# Altium PCB Smart-Button-PCB-v2.2.PcbDoc
Units mm, origin at the board's own origin, x right, y up, seen from the top; angles counter-clockwise.
Board outline 90 x 83 mm, 2 copper layers (Top Layer, Bottom Layer), stack 1.17 mm thick; 43 components, 20 nets, 161 pads, 0 vias.
Unrouted connection lines stored in the file: 71.
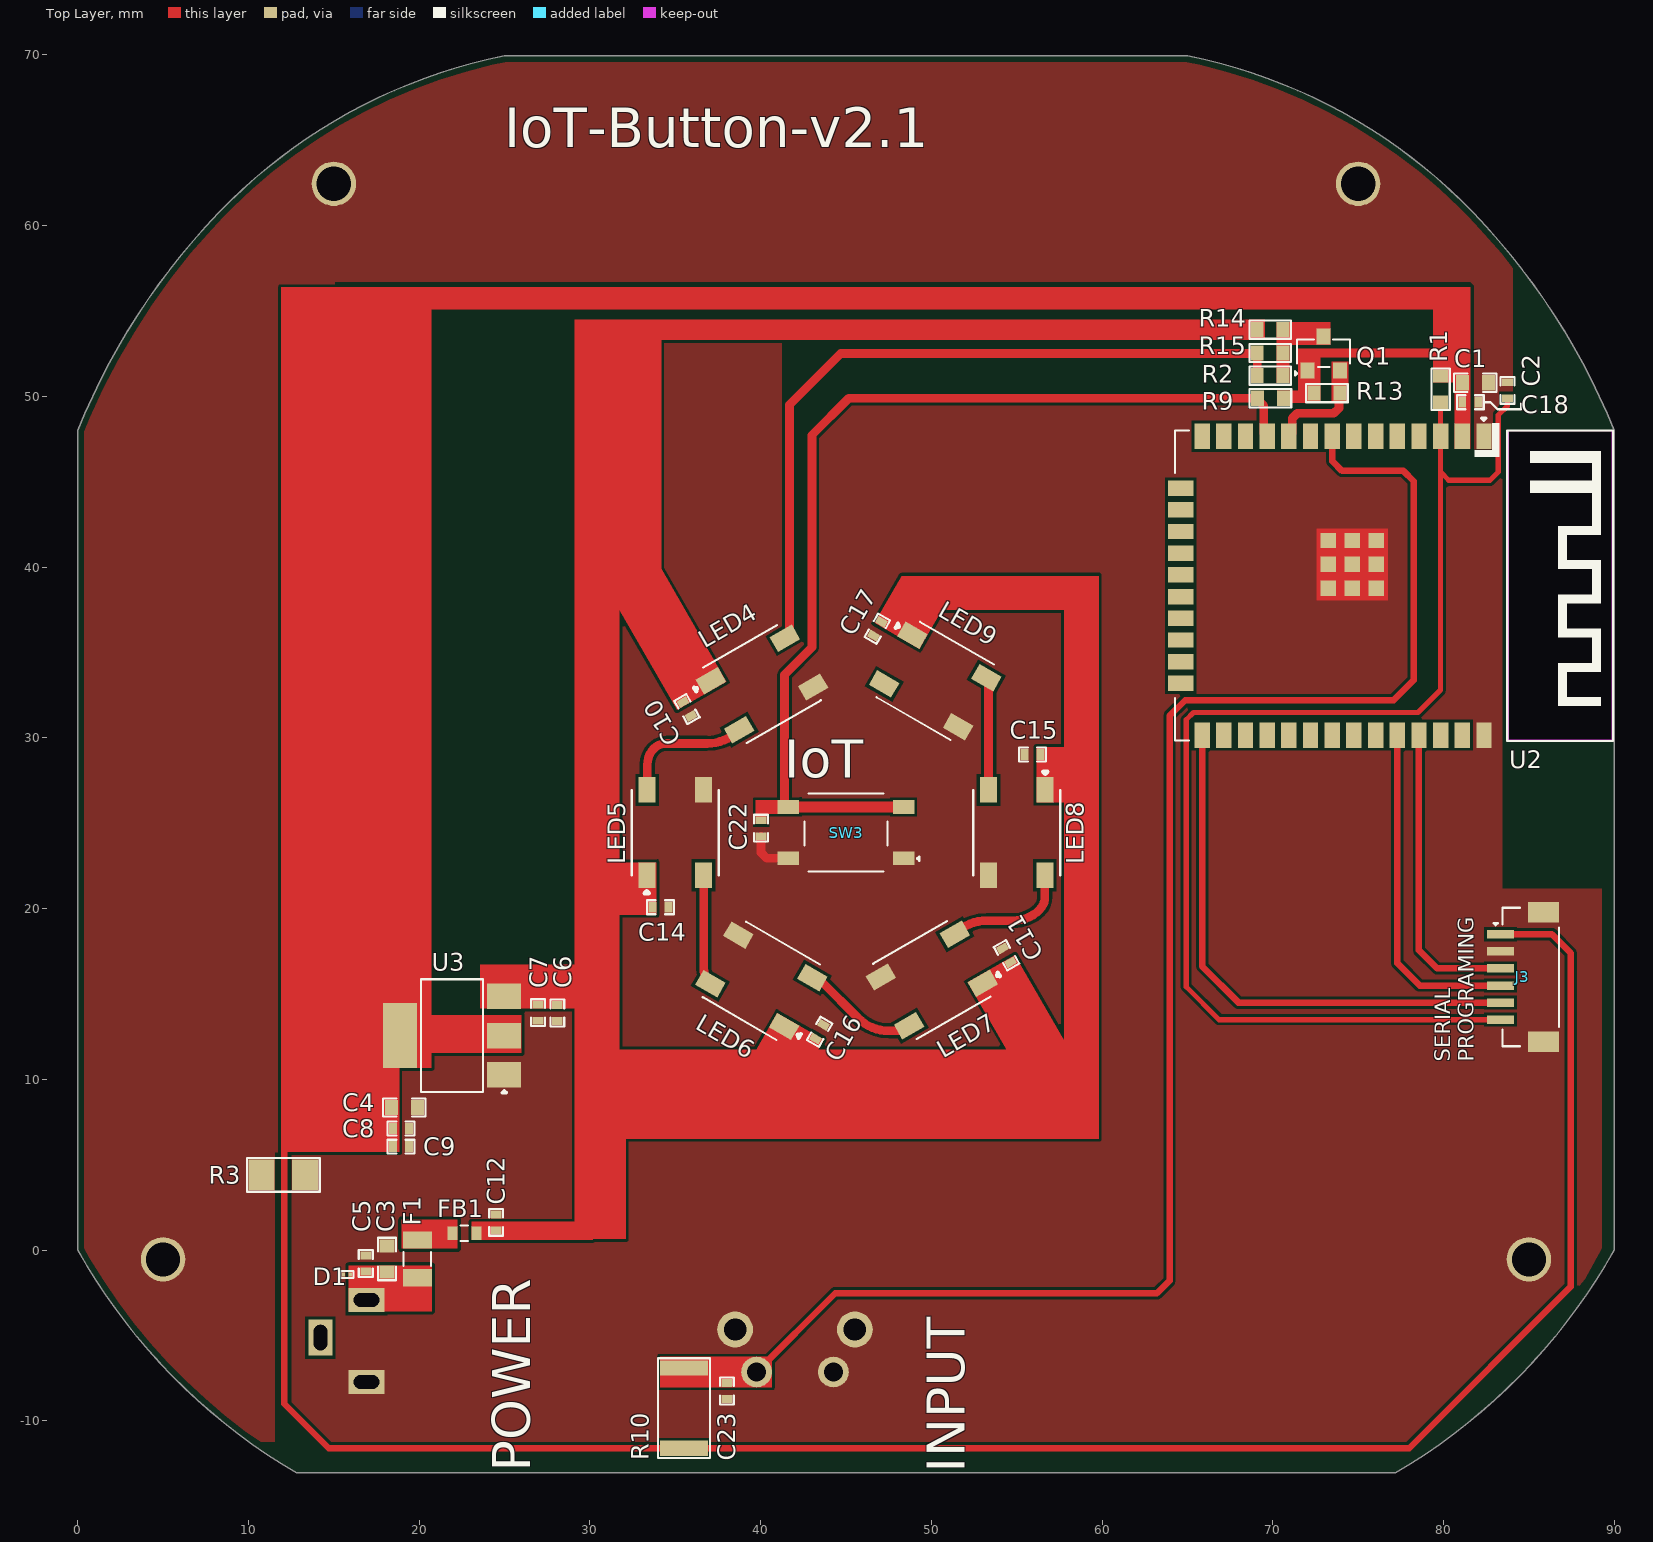
[diagram p0: Top Layer view]
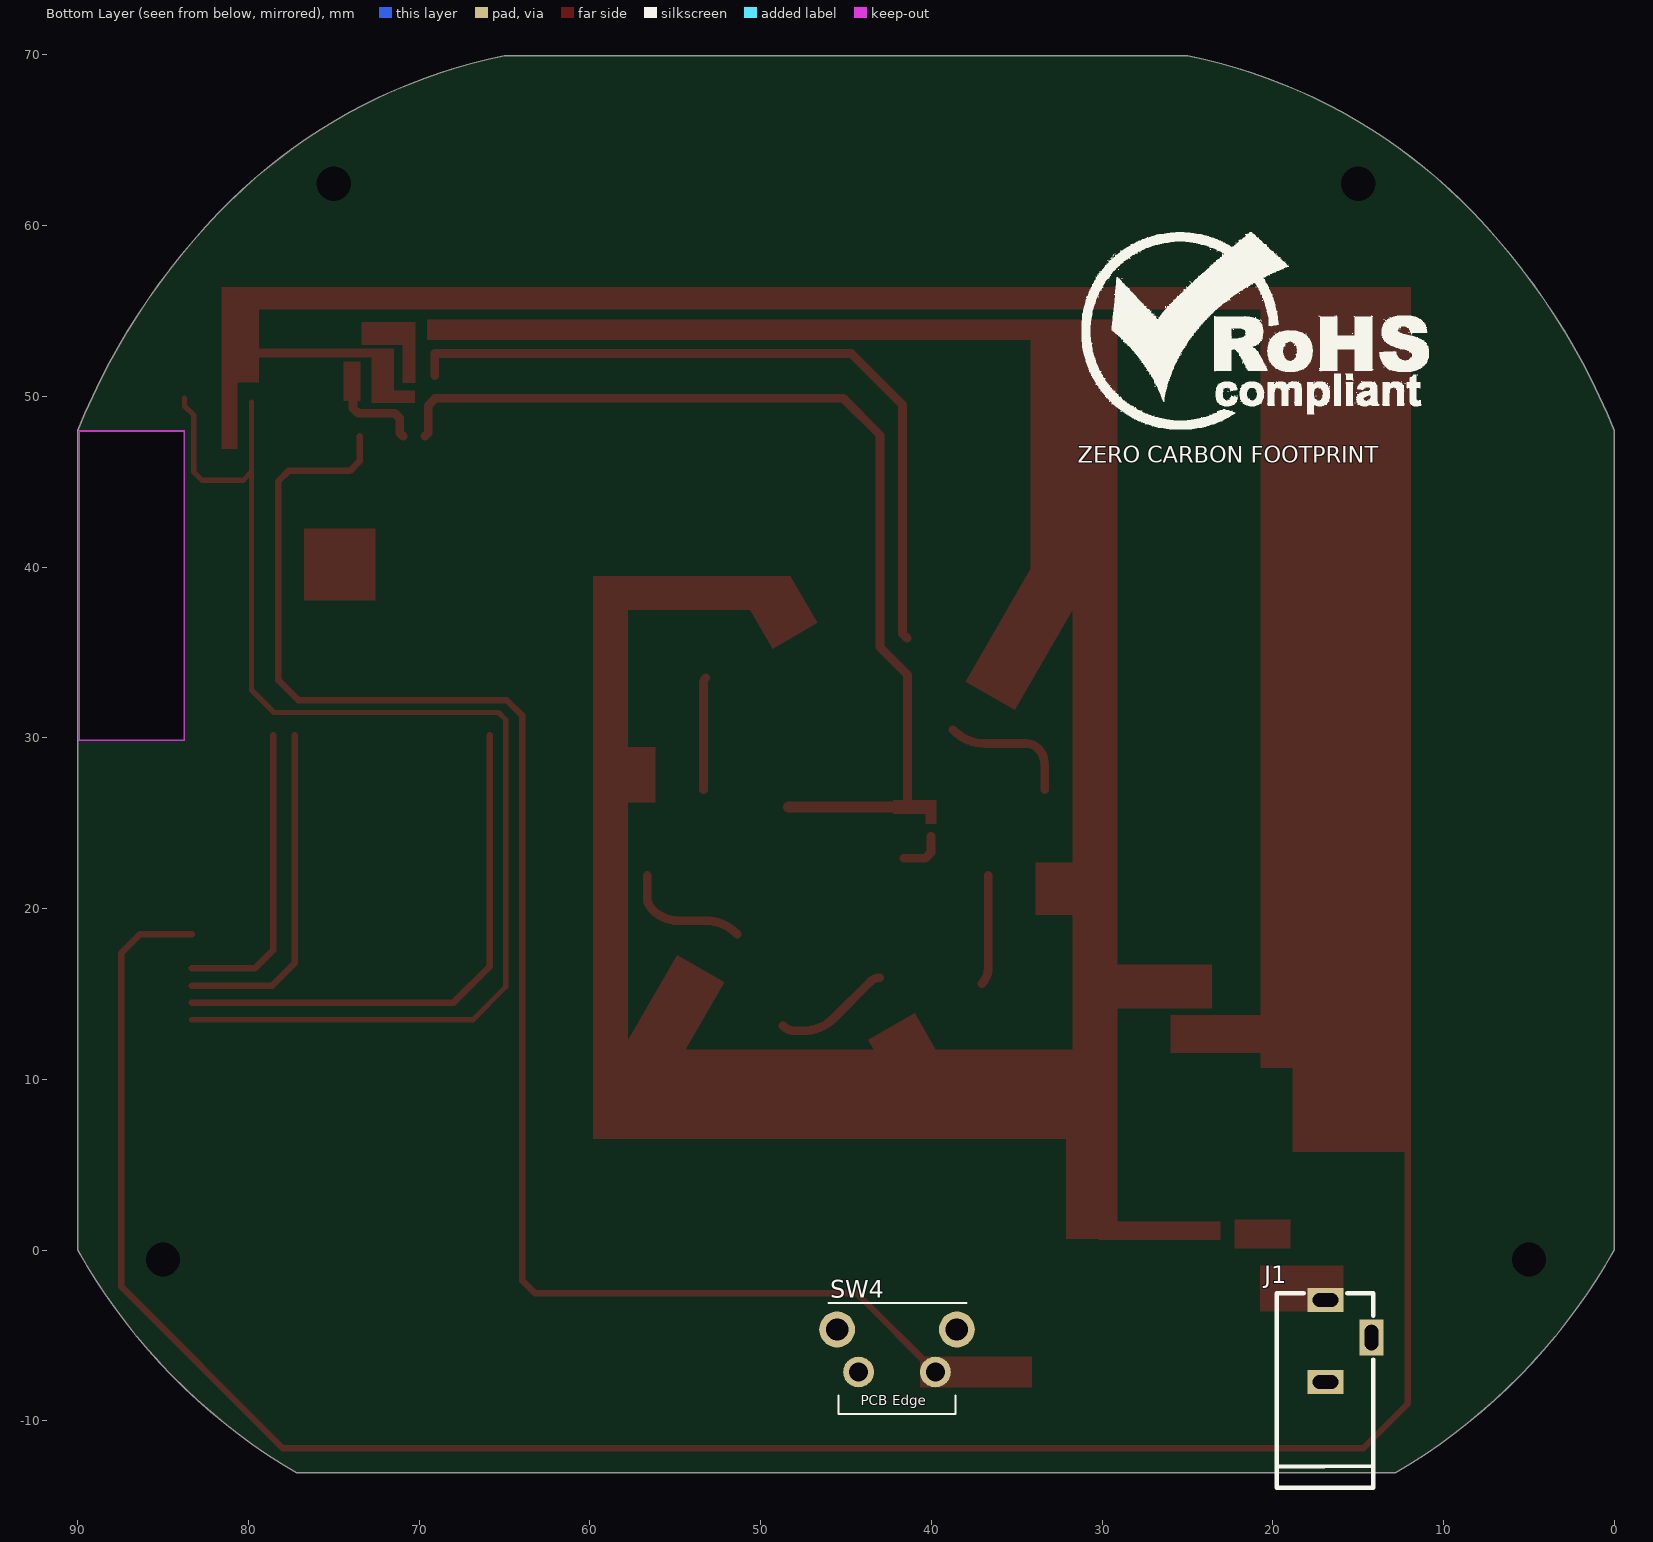
[diagram p1: Bottom Layer view, seen from below]
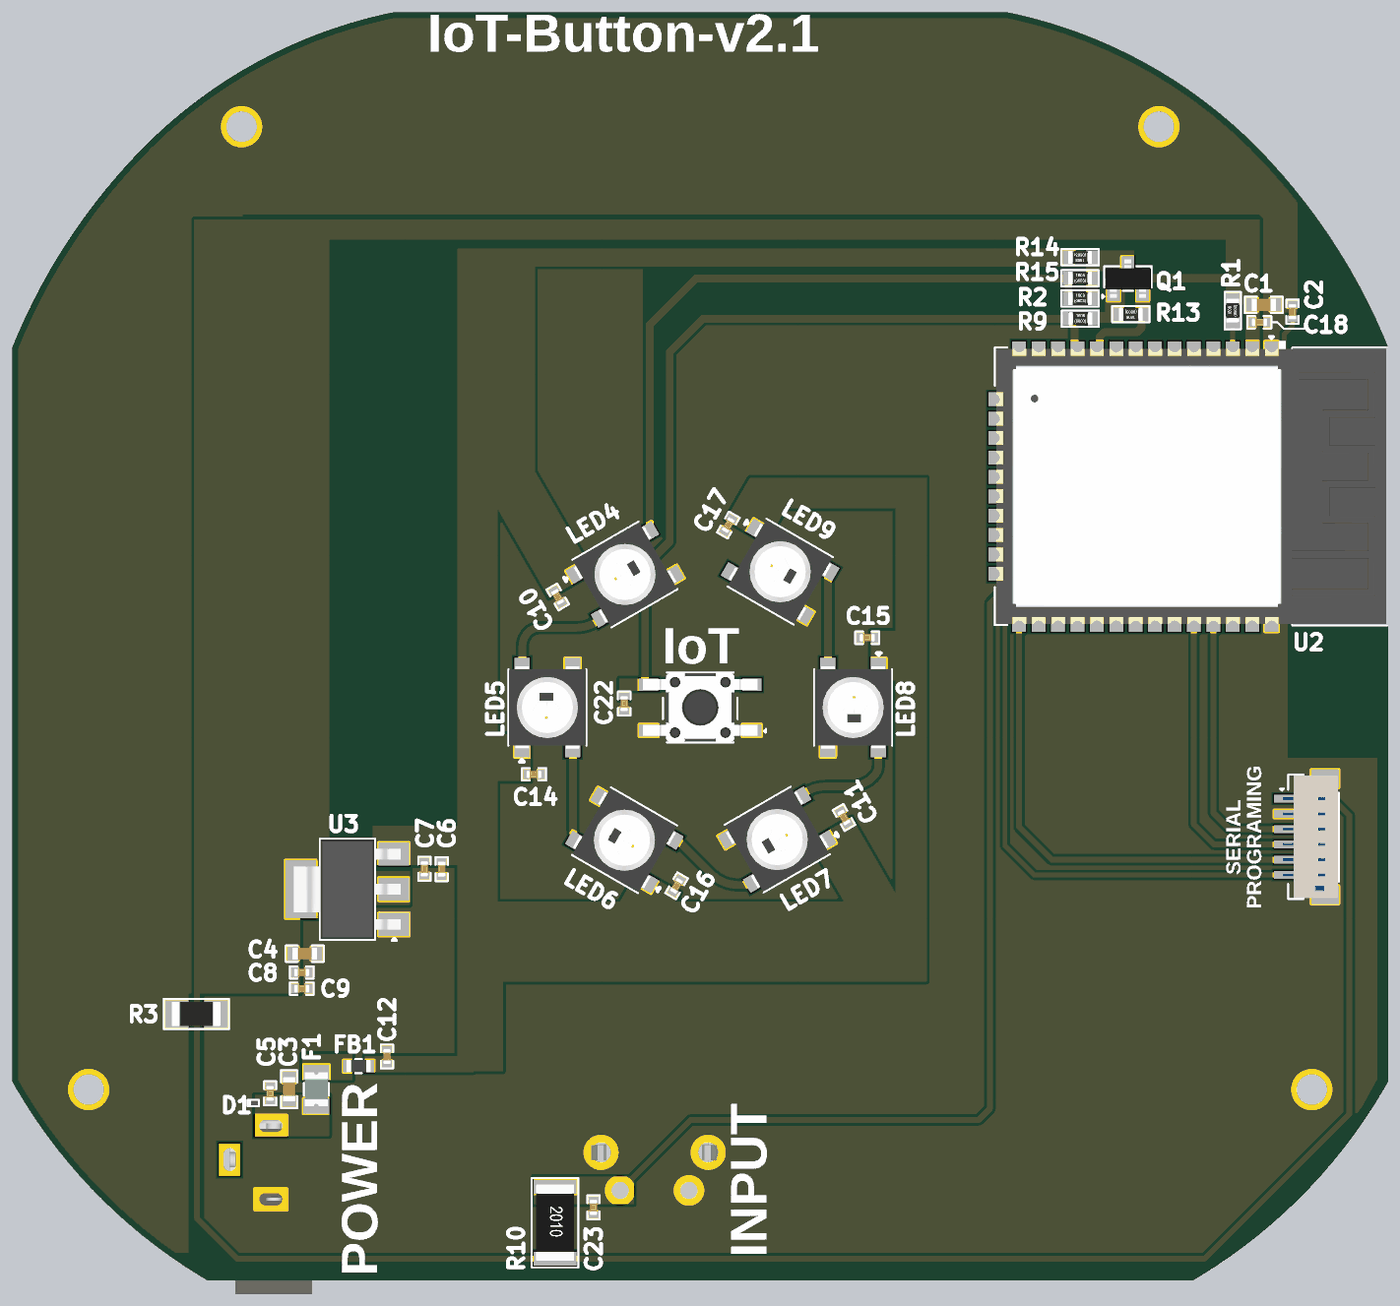
[diagram p2: 3D render of the assembled board from above, using the file's embedded part models]

## Layer stack, top to bottom
Top Solder: solder mask 0.01, Solder Resist, Dk 3.5
Top Layer: signal copper 0.035
Dielectric 1: dielectric 1.1, FR-4, Dk 4.8
Bottom Layer: signal copper 0.035
Bottom Solder: solder mask 0.01, Solder Resist, Dk 3.5

## Board outline
12.805,-13.044 cw(c30.512,17.147) 0,0 0,48 cw(c37.1,33.047) 8.25,60.754 cw(c31.33,38.589) 25,69.956 65,69.956 cw(c58.67,38.589) 81.75,60.754 cw(c52.9,33.047) 90,48 90,0 cw(c59.488,17.147) 77.195,-13.044
cut-out: 83.74,29.853 83.74,47.989 90,48 90,29.867

## Design rules (kind name [scope] priority, off if disabled: settings)
BoardOutlineClearance [All] p1: gap=0 ignorepadtopadclearanceinfootprint=FALSE except(0.381: Poly-OutlineEdge)
Clearance [All] p1: gap=0.178 ignorepadtopadclearanceinfootprint=TRUE
HoleToHoleClearance [All] p1: gap=0.127 allowstackedmicrovias=TRUE
MinimumSolderMaskSliver [All] p1: minsoldermaskwidth=0
PolygonConnect [All] p1: connectstyle=Direct reliefconductorwidth=0.432 reliefentries=4 polygonreliefangle="90 Angle" airgapwidth=0.254
RoutingLayers [All] p1: top layer_v5=TRUE bottom layer_v5=FALSE
RoutingVias [All] p1: holewidth=0.3 width=0.6 viastyle="Through Hole" minholewidth=0.3 minwidth=0.6 maxholewidth=0.3 maxwidth=0.6
SilkToSilkClearance [All] p1: silktosilkclearance=0
SilkToSolderMaskClearance [IsPad] p1: minsilkscreentomaskgap=0 clearancetoexposedcopper=TRUE
SolderMaskExpansion [All] p1: expansion=0.102 istentingtop=FALSE
UnRoutedNet [All] p1: checkbadconnections=TRUE
Width [All] p1: maxlimit=1.2 minlimit=0.254 preferedwidth=0.508 minimp=50.000000 maximp=50.000000 favimp=50.000000
24 further rules are at their usual default settings.

## Classes and differential pairs
component class U_Power-Section: C3 C4 C5 C6 C7 C8 C9 C12 D1 F1 FB1 J1 U3
component class U_LEDS: C10 C11 C14 C15 C16 C17 LED4 LED5 LED6 LED7 LED8 LED9 Q1 R2 R13 R14 R15
component class U_Controller-Section: C1 C2 C18 C22 C23 J3 R1 R3 R9 R10 SW3 SW4 U2

## Components (designator, comment, footprint, x,y, rotation, side; value= is the part's Value field where it differs from the comment)
C1 "22uF" Cap-0603 81.86,50.802 r180 top
C2 "100nF" Cap-0402 83.74,50.358 r270 top
C3 "1uF" Cap-0603 18.114,-0.522 r270 top
C4 "22uF" Cap-0603 19.133,8.349 r180 top
C5 "100nF" Cap-0402 16.87,-0.791 r270 top
C6 "4.7uF" Cap-0402 28.089,13.883 r90 top
C7 "1uF" Cap-0402 26.958,13.905 r90 top
C8 "1uF" Cap-0402 18.937,7.121 r180 top
C9 "0.1uF" Cap-0402 18.937,6.06 r180 top
C10 "100nF" Cap-0402 35.683,31.689 r120 top
C11 "100nF" Cap-0402 54.403,17.262 r300 top
C12 "0.1uF" Cap-0402 24.511,1.622 r270 top
C14 "100nF" Cap-0402 34.129,20.081 r180 top locked
C15 "100nF" Cap-0402 55.926,29.022 r0 top
C16 "100nF" Cap-0402 43.456,12.791 r240 top
C17 "100nF" Cap-0402 46.837,36.393 r60 top
C18 "100nF" Cap-0402 81.568,49.659 r180 top
C22 "100nF" Cap-0402 40.025,24.71 r90 top
C23 "100nF" Cap-0402 38.019,-8.248 r90 top
D1 "PESD5V0H1BSFYL" DSN0603-2 15.765,-1.425 r0 top
F1 "BSMD0805L-200" Fuse-0805 19.888,-0.522 r90 top
FB1 "BLM18SG121TN1D" "IND-0603 (1608 Metric)" 22.657,0.987 r180 top
J1 "HX DC002-1.3" "HX DC002-1.3" 16.916,-2.925 r90 bottom
J3 "Voltlink Target" "Voltlink Target" 84.598,15.996 r270 top
LED4 "WS2812B-XF02/W" WS2812B-XF02/W 40.078,33.161 r30 top
LED5 "WS2812B-XF02/W" WS2812B-XF02/W 35,24.456 r90 top locked
LED6 "WS2812B-XF02/W" WS2812B-XF02/W 40.041,15.773 r150 top
LED7 "WS2812B-XF02/W" WS2812B-XF02/W 50.033,15.815 r210 top
LED8 "WS2812B-XF02/W" WS2812B-XF02/W 55,24.456 r270 top locked
LED9 "WS2812B-XF02/W" WS2812B-XF02/W 50.227,33.339 r330 top
Q1 "Si2302CDS" Sot-23 72.974,52.514 r0 top
R1 "10K" Res-0603 79.828,50.421 r270 top
R2 "DNP" Res-0603 69.846,51.221 r180 top
R3 "0R" Res-1206 12.04,4.406 r0 top value=0mR
R9 "10K" Res-0603 69.858,49.894 r180 top
R10 "10K" RES-2010 35.505,-9.256 r270 top
R13 "10K" Res-0603 73.167,50.193 r0 top
R14 "10K" Res-0603 69.846,53.914 r0 top
R15 "1K" Res-0603 69.846,52.542 r180 top
SW3 "GT-TC074E-H080-L1" GT-TC074E-H080-L1 45,24.456 r180 top locked
SW4 "1825027-8" 1825027-8 42.013,-5.897 r180 bottom
U2 "ESP32-WROOM-32E-N8R2" "38-SMD Module" 73.488,38.915 r270 top
U3 "AMS1117-3.3" "SOT- 223" 21.916,12.563 r90 top

## Footprints (in the part's own frame and the unit in brackets; to place one, negate y for a bottom-side part, rotate by r counter-clockwise, add the part's x,y. Pads: shape width x height; smd on the part's side, far side on the other; paste and mask are expansions set on the pad)
"38-SMD Module" [mm]
  rect 1.5x0.9 smd: 1(-8.75,8.88) 2(-8.75,7.61) 3(-8.75,6.34) 4(-8.75,5.07) 5(-8.75,3.8) 6(-8.75,2.53) 7(-8.75,1.26) 8(-8.75,-0.01) 9(-8.75,-1.28) 10(-8.75,-2.55) 11(-8.75,-3.82) 12(-8.75,-5.09) 13(-8.75,-6.36) 14(-8.75,-7.63) 25(8.75,-7.63) 26(8.75,-6.36) 27(8.75,-5.09) 28(8.75,-3.82) 29(8.75,-2.55) 30(8.75,-1.28) 31(8.75,-0.01) 32(8.75,1.26) 33(8.75,2.53) 34(8.75,3.8) 35(8.75,5.07) 36(8.75,6.34) 37(8.75,7.61) 38(8.75,8.88)
  rect 0.9x1.5 smd: 15(-5.71,-8.88) 16(-4.44,-8.88) 17(-3.17,-8.88) 18(-1.9,-8.88) 19(-0.63,-8.88) 20(0.64,-8.88) 21(1.91,-8.88) 22(3.18,-8.88) 23(4.45,-8.88) 24(5.72,-8.88)
  rect 0.9x0.9 smd: 39(-2.65,2.56) 40(-1.25,2.56) 41(0.15,2.56) 42(-2.65,1.16) 43(-1.25,1.16) 44(0.15,1.16) 45(-2.65,-0.24) 46(-1.25,-0.24) 47(0.15,-0.24)
  Keep-Out Layer region: -9.043,10.287 9.042,10.287 9.042,16.383 -9.043,16.383
  silkscreen extent -9.8,-9.22 9.09,16.43, body extent -9,-9.12 9,16.38, height 3.25
1825027-8 [mm]
  round 1.8 hole 1.1: 1(-2.25,-1.245) 2(2.25,-1.245)
  round 2.1 hole 1.3: 3(3.505,1.245) 4(-3.505,1.245)
  silkscreen extent -4.01,-3.71 4.06,2.79, body extent -4.18,-7.11 4.23,2.73, height 8
Cap-0402 [mil]
  rect 18x25 smd mask+2.36: 1(-18.5,0) 2(18.5,0)
  silkscreen extent -31,-16 31,16, body extent -20,-10 20,10, height 19
Cap-0603 [mil]
  rect 30x35 smd mask+2.36: 1(-30,0) 2(30,0)
  silkscreen extent -49,-21 49,21, body extent -32,-16 31,16, height 34
DSN0603-2 [mm]
  rect 0.2x0.24 smd mask+0.055: 1(-0.2,0) 2(0.2,0)
  silkscreen extent -0.38,-0.2 0.38,0.2, body extent -0.3,-0.15 0.3,0.15, height 0.32
Fuse-0805 [mm]
  rect 1x1.7 smd: 1(-1.1,0) 2(1.1,0)
  silkscreen extent -0.41,-0.81 0.41,0.81, body extent -1.1,-0.75 1.1,0.75, height 1.24
GT-TC074E-H080-L1 [mm]
  rect 1.25x0.8 smd: 1(-3.375,1.5) 2(3.375,1.5) 3(-3.375,-1.5) 4(3.375,-1.5)
  silkscreen extent -4.29,-2.29 2.44,2.29, body extent -3.75,-2.25 3.75,2.25, height 8
"HX DC002-1.3" [mm]
  rect 1.4x2.1 hole 0.8 slot 1.5 at 90 deg: 1(0,0) 2(-4.8,0)
  rect 2.1x1.4 hole 0.8 slot 1.5 at 0 deg: 3(-2.2,-2.7)
  silkscreen extent -11,-2.79 0.4,2.84, body extent -11,-2.69 0.4,2.69, height 7.5
"IND-0603 (1608 Metric)" [mm] "0.063\" L x 0.032\" W (1.60mm x 0.80mm)"
  rect 0.6x0.8 smd: 1(-0.7,0) 2(0.7,0)
  silkscreen extent -0.2,-0.46 0.23,0.46, body extent -0.8,-0.4 0.8,0.4, height 0.78
Res-0603 [mil]
  rect 30x35 smd: 1(-30,0) 2(30,0)
  silkscreen extent -48,-21 48,21, body extent -31,-17 31,17, height 18
Res-1206 [mil]
  rect 60x70 smd: 1(-50,0) 2(50,0)
  silkscreen extent -84,-39 84,39, body extent -63,-31 63,31, height 24
RES-2010 [mm]
  rect 0.9x2.8 smd: 1(-2.35,0) 2(2.35,0)
  silkscreen extent -2.92,-1.52 2.92,1.52, body extent -2.5,-1.25 2.5,1.25, height 0.6
Sot-23 [mm] "TRANS NPN 40V 0.6A SOT23"
  rect 0.82x0.92 smd: 1(-0.95,-1) 2(0.95,-1) 3(0,1)
  silkscreen extent -1.68,-1.3 1.55,0.81, body extent -1.5,-1.25 1.5,1.25, height 1.05
"SOT- 223" [mm]
  rect 1.5x2 smd: 1(-2.3,-3.05) 2(0,-3.05) 3(2.3,-3.05)
  rect 3.8x2 smd: 4(0,3.05)
  silkscreen extent -3.35,-3.2 3.3,1.8, body extent -3.25,-3.5 3.25,3.5, height 1.61
"Voltlink Target" [mm]
  rect 0.5x1.6 smd: 1(-2.5,-1.262) 2(-1.5,-1.262) 3(-0.5,-1.262) 4(0.5,-1.262) 5(1.5,-1.262) 6(2.5,-1.262)
  rect 1.2x1.8 smd: MP1(-3.8,1.262) MP2(3.8,1.262)
  silkscreen extent -4.06,-1.68 4.06,2.17, body extent -4,-1.49 4,2.11, height 4.25
WS2812B-XF02/W [mm]
  rect 1.5x1 smd: 1(-2.5,1.65) 2(-2.5,-1.65) 3(2.5,-1.65) 4(2.5,1.65)
  silkscreen extent -3.56,-2.55 2.5,2.55, body extent -2.7,-2.5 2.7,2.5, height 1.55

## Part data
C1 C4: library part CL10A226MO7JZNC, "CAP CER 22UF 16V X5R 0603", Case Code (Imperial)=0603, Case Code (Metric)=1608, LCSC Part Number=C2762594, Manufacturer=Samsung, Max Operating Temperature=85°C, Min Operating Temperature=-55°C, Tolerance=20%, Voltage Rating=16V, Case/Package=0603, ComponentLink1Description=http://www.samsungsem.com/kr/support/product-search/mlcc/CL10A226MO7JZNC.jsp?src-supplier=Digikey, ComponentLink1URL=http://www.samsungsem.com/kr/support/product-search/mlcc/CL10A226MO7JZNC.jsp?src-supplier=Digikey, ComponentLink2Description=https://datasheet.octopart.com/CL10A226MO7JZNC-Samsung-Electro-Mechanics-datasheet-149156497.pdf?src-supplier=Future+Electronics, ComponentLink2URL=https://datasheet.octopart.com/CL10A226MO7JZNC-Samsung-Electro-Mechanics-datasheet-149156497.pdf?src-supplier=Future+Electronics, Height=900um, Item Type=Capacitors, Manufacturer Part Number=CL10A226MO7JZNC, Material=4241ConductorMaterial, Mounting Technology="Surface Mount", Packaging="Cut Tape", Pricing="1=0.65, 10=0.391, 50=0.2884, 100=0.2564, 500=0.20198, 1000=0.18499 (USD)", RoHS=Yes, RoHS Compliant=Yes, Series=CL, Stock=944984, Supplier=Digikey
C2 C5 C10 C11 C14 C15 C16 C17 C18 C22 C23: library part CC0402KRX5R8BB104, "CAP CER 0.1UF 25V X5R 0402", Case Code (Imperial)=0402, Case Code (Metric)=1005, Dielectric=X5R, LCSC Part Number=C106256, Manufacturer=Yageo, Max Operating Temperature=85°C, Min Operating Temperature=-55°C, Resistor Type=Ceramic, Supplier Part Number 1=311-1697-1-ND, Tolerance=10%, Voltage Rating=25V, Capacitance=100nF, Case/Package=0402, Category="Ceramic Capacitors", ComponentLink1Description=http://www.mouser.com/ds/2/447/UPY-GPHC_X5R_4V-to-50V_25-1131599.pdf?src-supplier=Mouser, ComponentLink1URL=http://www.mouser.com/ds/2/447/UPY-GPHC_X5R_4V-to-50V_25-1131599.pdf?src-supplier=Mouser, ComponentLink2Description=http://www.yageo.com/documents/recent/UPY-GPHC_X5R_4V-to-50V-16.pdf?src-supplier=Future+Electronics, ComponentLink2URL=http://www.yageo.com/documents/recent/UPY-GPHC_X5R_4V-to-50V-16.pdf?src-supplier=Future+Electronics, ComponentLink3Description=http://www.yageo.com/documents/recent/UPY-GPHC_X5R_4V-to-50V_25.pdf?src-supplier=Digi-Key, ComponentLink3URL=http://www.yageo.com/documents/recent/UPY-GPHC_X5R_4V-to-50V_25.pdf?src-supplier=Digi-Key, Depth=0.5mm, Halogen Free="Halogen Free", Item Type=Capacitor, Lead Free="Lead Free", Length=0.039inch, Manufacturer Part Number=CC0402KRX5R8BB104, Mount="Surface Mount", Packaging="Tape and Reel", Pricing 1="1=0.10000, 10=0.03800, 50=0.02100, 100=0.01710, 500=0.01224, 1000=0.00961, 2500=0.00874, 5000=0.00804 (USD)", RoHS=Yes, RoHS Compliant=Yes, Series=CC, Stock 1=4598218, Supplier 1=Digi-Key, Thickness=0.022inch, Voltage Rating (DC)=25V, Width=0.02inch
C3: library part CC0603KRX5R8BB105, "CAP CER 1UF 25V X5R 0603", Case Code (Imperial)=0603, Case Code (Metric)=1608, Dielectric=X5R, LCSC Part Number=C14664, Manufacturer=Yageo, Max Operating Temperature=85°C, Min Operating Temperature=-55°C, Package Quantity=1, Supplier Part Number 1=311-1445-1-ND, Tolerance=10%, Voltage Rating=25V, Capacitance=1uF, Case/Package=0603, Category="Ceramic Capacitors", ComponentLink1Description=https://datasheet.ciiva.com/176/mlccorderingcode-176785.pdf?src-supplier=Digi-Key, ComponentLink1URL=https://datasheet.ciiva.com/176/mlccorderingcode-176785.pdf?src-supplier=Digi-Key, ComponentLink2Description=https://datasheet.ciiva.com/176/mlccorderingcode-176786.pdf?src-supplier=Digi-Key, ComponentLink2URL=https://datasheet.ciiva.com/176/mlccorderingcode-176786.pdf?src-supplier=Digi-Key, ComponentLink3Description=https://datasheet.ciiva.com/176/mlccorderingcode-176787.pdf?src-supplier=Digi-Key, ComponentLink3URL=https://datasheet.ciiva.com/176/mlccorderingcode-176787.pdf?src-supplier=Digi-Key, ComponentLink4Description=https://datasheet.ciiva.com/17436/upy-gphc-x5r-4v-to-50v-12-17436952.pdf?src-supplier=Avnet+Europe, ComponentLink4URL=https://datasheet.ciiva.com/17436/upy-gphc-x5r-4v-to-50v-12-17436952.pdf?src-supplier=Avnet+Europe, ComponentLink5Description=https://datasheet.ciiva.com/7978/1525783-7978171.pdf?src-supplier=Element14, ComponentLink5URL=https://datasheet.ciiva.com/7978/1525783-7978171.pdf?src-supplier=Element14, ComponentLink6Description=https://datasheet.ciiva.com/11586/upy-gphc-x5r-4v-to-50v-12-11586318.pdf?src-supplier=Avnet, ComponentLink6URL=https://datasheet.ciiva.com/11586/upy-gphc-x5r-4v-to-50v-12-11586318.pdf?src-supplier=Avnet, Construction=Flat, Depth=0.8mm, Halogen Free="Halogen Free", Height=0.8mm, Item Type=Capacitor, Lead Free="Lead Free", Length=1.6mm, Manufacturer Part Number=CC0603KRX5R8BB105, Mount="Surface Mount", Number of Pins=2, Packaging="Tape and Reel", Pricing 1="1=0.12000, 10=0.08400, 50=0.04760, 100=0.03940, 500=0.02764, 1000=0.02288 (USD)", Radiation Hardening=No, REACH SVHC="No SVHC", RoHS=Yes, RoHS Compliant=Yes, Series=CC, Stock 1=919939, Supplier 1=Digi-Key, Termination=SMD/SMT, Thickness=0.035inch, Voltage Rating (DC)=25V, Width=0.031inch
C6: library part CC0402KRX5R6BB475, "CAP CER 4.7UF 10V X5R 0402", Case Code (Imperial)=0402, Case Code (Metric)=1005, LCSC Part Number=C326586, Manufacturer=Yageo, Max Operating Temperature=85°C, Min Operating Temperature=-55°C, Supplier Part Number 1=3871698, Tolerance=10%, Voltage Rating=10V, Capacitance=4.7uF, Case/Package=0402, Category="Ceramic Capacitors", ComponentLink1Description=http://www.yageo.com/documents/recent/UPY-GPHC_X5R_4V-to-50V_25.pdf?src-supplier=Digi-Key, ComponentLink1URL=http://www.yageo.com/documents/recent/UPY-GPHC_X5R_4V-to-50V_25.pdf?src-supplier=Digi-Key, Manufacturer Part Number=CC0402KRX5R6BB475, Mount="Surface Mount", Packaging="Cut Tape", Pricing 1="10000=0.02310, 50000=0.02100 (GBP)", RoHS=Yes, RoHS Compliant=Yes, Stock 1=20000, Supplier 1=Farnell
C7 C8: library part CC0402KRX5R7BB105, "CAP CER 1UF 16V X5R 0402", Case Code (Imperial)=0402, Case Code (Metric)=1005, Dielectric=X5R, LCSC Part Number=C325464, Manufacturer=Yageo, Max Operating Temperature=85°C, Min Operating Temperature=-55°C, Supplier Part Number 1=311-1691-6-ND, Tolerance=10%, Voltage Rating=16V, Capacitance=1uF, Case/Package=0402, ComponentLink1Description=http://www.yageo.com/documents/recent/UPY-GPHC_X5R_4V-to-50V_12.pdf?src-supplier=Avnet+Europe, ComponentLink1URL=http://www.yageo.com/documents/recent/UPY-GPHC_X5R_4V-to-50V_12.pdf?src-supplier=Avnet+Europe, Composition=Ceramic, Depth=0.5mm, Halogen Free="Halogen Free", Height=0.5mm, Item Type=Capacitor, Lead Free="Lead Free", Length=1mm, Manufacturer Part Number=CC0402KRX5R7BB105, Mount="Surface Mount", Packaging="Tape and Reel", Pricing 1="1=0.36, 10=0.252, 100=0.1512, 500=0.1134, 1000=0.09576, 2500=0.09072, 5000=0.08568 (USD)", Radiation Hardening=No, Stock 1=1405667, Supplier 1=Digi-Key, Termination=SMD/SMT, Thickness=0.022inch, Voltage Rating (DC)=16V, Weight=2.3E-05oz, Width=0.02inch
C9 C12: library part CL05B104KB54PNC, "CAP CER 0.1UF 50V X7R 0402", LCSC Part Number=C307331, Manufacturer=Samsung, Supplier Part Number 1=1276-CL05B104KB54PNCDKR-ND, Manufacturer Part Number=CL05B104KB54PNC, Pricing 1="1=0.1, 10=0.067, 50=0.0366, 100=0.0299, 500=0.02138, 1000=0.01681, 2500=0.01528, 5000=0.01406 (USD)", Stock 1=8594, Supplier 1=Digi-Key
D1: "TVS DIODE 5VWM 6.3VC DSN0603-2", LCSC Part Number=C477989, Manufacturer=Nexperia, Category="ESD and Circuit Protection ICs", ComponentLink1Description=http://www.farnell.com/datasheets/1961312.pdf?src-supplier=Farnell, ComponentLink1URL=http://www.farnell.com/datasheets/1961312.pdf?src-supplier=Farnell, ComponentLink2Description=https://assets.nexperia.com/documents/data-sheet/PESD5V0H1BSF.pdf?src-supplier=Digi-Key, ComponentLink2URL=https://assets.nexperia.com/documents/data-sheet/PESD5V0H1BSF.pdf?src-supplier=Digi-Key, ComponentLink3Description=http://www.farnell.com/datasheets/1961312.pdf?src-supplier=Newark, ComponentLink3URL=http://www.farnell.com/datasheets/1961312.pdf?src-supplier=Newark, Item Type=Diode, Manufacturer Part Number=PESD5V0H1BSFYL, Pricing 1="18000=0.06453, 36000=0.06278, 54000=0.06104, 90000=0.05930, 180000=0.05755, 900000=0.05581, 1800000=0.05406 (USD)", RoHS=Yes, RoHS Compliant=Yes, Stock 1=9000, Supplier 1=Avnet, Supplier Part Number 1=PESD5V0H1BSFYL
F1: "6V 2A 50A 1W -40℃~+85℃ 4A 4mΩ 5s 45mΩ 0805 Resettable Fuses ROHS", LCSC Part Number=C2757931, Manufacturer=BHFUSE, Package=0805, ComponentLink1Description=LCSC, ComponentLink1URL=https://www.lcsc.com/product-detail/Resettable-Fuses_BHFUSE-BSMD0805L-200_C2757931.html, Item Type=Fuse, Manufacturer Part Number=BSMD0805L-200
FB1: "FERRITE BEAD 120 OHM 0603 1LN", Case Code (Imperial)=0603, Case Code (Metric)=1608, Current Rating=3A, DC Resistance (DCR)=25mR, Frequency=100MHz, LCSC Part Number=C113030, Manufacturer=Murata, Max Operating Temperature=125°C, Min Operating Temperature=-55°C, Package Quantity=1, Tolerance=25%, Case/Package=0603, Category="Ferrite Beads and Chips", ComponentLink1Description=https://datasheet.ciiva.com/1012/l0110s0100blm18s-1012624.pdf?src-supplier=Digi-Key, ComponentLink1URL=https://datasheet.ciiva.com/1012/l0110s0100blm18s-1012624.pdf?src-supplier=Digi-Key, ComponentLink2Description=https://datasheet.ciiva.com/11799/0900766b811b5866-11799181.pdf?src-supplier=RSComponents, ComponentLink2URL=https://datasheet.ciiva.com/11799/0900766b811b5866-11799181.pdf?src-supplier=RSComponents, ComponentLink3Description=https://datasheet.ciiva.com/18093/getdatasheetpartid-295885-18093249.pdf?src-supplier=Verical, ComponentLink3URL=https://datasheet.ciiva.com/18093/getdatasheetpartid-295885-18093249.pdf?src-supplier=Verical, ComponentLink4Description=https://datasheet.ciiva.com/41449/001171723-da-01-en-chip-drossel0603-120r-3000ma-1-6x0-8mm-41449353.pdf?src-supplier=Conrad, ComponentLink4URL=https://datasheet.ciiva.com/41449/001171723-da-01-en-chip-drossel0603-120r-3000ma-1-6x0-8mm-41449353.pdf?src-supplier=Conrad, ComponentLink5Description=https://datasheet.ciiva.com/41449/001172312-da-01-en-drossel-0603-120r-1-6x0-8mm-10000st-41449675.pdf?src-supplier=Conrad, ComponentLink5URL=https://datasheet.ciiva.com/41449/001172312-da-01-en-drossel-0603-120r-1-6x0-8mm-10000st-41449675.pdf?src-supplier=Conrad, ComponentLink6Description=https://datasheet.ciiva.com/8021/5151-8021511.pdf?src-supplier=Element14, ComponentLink6URL=https://datasheet.ciiva.com/8021/5151-8021511.pdf?src-supplier=Element14, ComponentLink7Description=https://datasheet.ciiva.com/8021/5151-8021512.pdf?src-supplier=Element14, ComponentLink7URL=https://datasheet.ciiva.com/8021/5151-8021512.pdf?src-supplier=Element14, ComponentLink8Description=https://datasheet.ciiva.com/14122/blm-series-eng-tds-14122906.pdf?src-supplier=Distrelec, ComponentLink8URL=https://datasheet.ciiva.com/14122/blm-series-eng-tds-14122906.pdf?src-supplier=Distrelec, ComponentLink9Description=https://datasheet.ciiva.com/1012/l0110s0100blm18s-1012623.pdf?src-supplier=Digi-Key, ComponentLink9URL=https://datasheet.ciiva.com/1012/l0110s0100blm18s-1012623.pdf?src-supplier=Digi-Key, ComponentLink10Description=https://datasheet.ciiva.com/1012/l0110s0100blm18s-1012625.pdf?src-supplier=Digi-Key, ComponentLink10URL=https://datasheet.ciiva.com/1012/l0110s0100blm18s-1012625.pdf?src-supplier=Digi-Key, ComponentLink11Description=https://datasheet.ciiva.com/16395/l0110s0100blm18s-16395498.pdf?src-supplier=Future+Electronics, ComponentLink11URL=https://datasheet.ciiva.com/16395/l0110s0100blm18s-16395498.pdf?src-supplier=Future+Electronics, Core Material=Ferrite, DC Resistance-Max=25mR, Depth=0.8mm, Height=0.8mm, Impedance=120R, Item Type="Ferrite Bead", Lead Free="Lead Free", Length=1.6mm, Manufacturer Part Number=BLM18SG121TN1D, Material=Steel,Ferrite, Max Current Rating=3A, Max DC Current=3A, Number of Circuits=1, Number of Lines=1, Number of Pins=2, Packaging="Tape and Reel", Pricing 1="1=0.12640, 10=0.08350, 25=0.07210, 100=0.05150, 250=0.04730, 500=0.04110, 1000=0.03420, 3000=0.03360, 6000=0.03320, 15000=0.03270, 30000=0.03200, 75000=0.03150 (USD)", Reach SVHC Compliant=Yes, RoHS=Yes, RoHS Compliant=Yes, Series=BLM18S, Shielding=Unshielded, Stock 1=82612, Supplier 1="Arrow Electronics", Supplier Part Number 1=BLM18SG121TN1D, Termination=SMD/SMT, Test Frequency=100MHz, Width=0.8mm
J1: "Right Angle DC Power Jack -40℃~+55℃ 500mA 30V Through Hole DC Power Connectors ROHS", LCSC Part Number=C5184827, Manufacturer=hanxia, Package=Plugin, ComponentLink1Description=LCSC, ComponentLink1URL=https://www.lcsc.com/product-detail/C5184827.html?s_z=n_DC002-1.3, Item Type="DC Connector", Manufacturer Part Number="HX DC002-1.3"
J3: library part C145963, "1x6P SH 1 1mm 6 SMD,P=1mm Wire To Board / Wire To Wire Connector ROHS", Manufacturer=BOOMELE, Package=SMD,P=1mm, ComponentLink1Description=LCSC, ComponentLink1URL=https://www.lcsc.com/product-detail/Wire-To-Board-Wire-To-Wire-Connector_BOOMELE-Boom-Precision-Elec-C145963_C145963.html, Item Type=Connector, LCSC Part Number=C145963, Manufacturer Part Number=C145963
LED4 LED5 LED6 LED7 LED8 LED9: "SMD5050 Light Emitting Diodes (LED) ROHS", LCSC Part Number=C4154882, Manufacturer=Worldsemi, Package=SMD5050, ComponentLink1Description=LCSC, ComponentLink1URL=https://www.lcsc.com/product-detail/Light-Emitting-Diodes-LED_Worldsemi-WS2812B-XF02-W_C4154882.html, Item Type="RGB LED", Manufacturer Part Number=WS2812B-XF02/W
Q1: "N-CHANNEL 20-V (D-S) MOSFET", LCSC Part Number=C5310968, Manufacturer="TECH PUBLIC", Manufacturer Part Number=SI2302CDS, Package=SOT-23, ComponentLink1Description=LCSC, ComponentLink1URL=https://www.lcsc.com/product-detail/MOSFETs_TECH-PUBLIC-SI2302CDS_C5310968.html, Item Type=Mosfet
R1 R9 R13 R14: library part RC0603FR-0710KL, "RES SMD 10K Ohm 1% 1/10W 0603", Case Code (Imperial)=0603, Case Code (Metric)=1608, LCSC Part Number=C98220, Manufacturer=Yageo, Max Operating Temperature=155°C, Max Power Dissipation=100mW, Min Operating Temperature=-55°C, Resistance=10kR, Resistance Tolerance=1%, Resistor Type="Thick Film", Supplier Part Number 1=311-10.0KHRCT-ND, Temperature Coefficient=100ppm/°C, Voltage Rating=75V, Voltage Rating (DC)=50V, Case/Package=0603, Category="Chip SMD Resistors", ComponentLink1Description=https://datasheet.ciiva.com/7660/38590-7660789.pdf?src-supplier=Element14, ComponentLink1URL=https://datasheet.ciiva.com/7660/38590-7660789.pdf?src-supplier=Element14, ComponentLink2Description=https://datasheet.ciiva.com/7983/443971-7983596.pdf?src-supplier=Element14, ComponentLink2URL=https://datasheet.ciiva.com/7983/443971-7983596.pdf?src-supplier=Element14, ComponentLink3Description=https://datasheet.ciiva.com/22747/443971-22747519.pdf?src-supplier=Element14, ComponentLink3URL=https://datasheet.ciiva.com/22747/443971-22747519.pdf?src-supplier=Element14, ComponentLink4Description=https://datasheet.ciiva.com/46440/1868787-46440891.pdf?src-supplier=Element14, ComponentLink4URL=https://datasheet.ciiva.com/46440/1868787-46440891.pdf?src-supplier=Element14, ComponentLink5Description=https://datasheet.ciiva.com/7746/1738695-7746239.pdf?src-supplier=Element14, ComponentLink5URL=https://datasheet.ciiva.com/7746/1738695-7746239.pdf?src-supplier=Element14, ComponentLink6Description=https://datasheet.ciiva.com/15189/getdatasheetpartid-409289-15189591.pdf?src-supplier=Verical, ComponentLink6URL=https://datasheet.ciiva.com/15189/getdatasheetpartid-409289-15189591.pdf?src-supplier=Verical, Construction=Rectangular, Depth=0.8mm, Features="Moisture Resistant", Height=0.45mm, Item Type=Resistor, Lead Free="Lead Free", Lead Pitch=0.3mm, Length=1.6mm, Manufacturer Part Number=RC0603FR-0710KL, Military Standard=Not, Number of Pins=2, Number of Terminations=2, Packaging="Tape and Reel", Power Rating=100mW, Pricing 1="1=0.10000, 10=0.02400, 100=0.00970, 1000=0.00436, 2500=0.00378 (USD)", REACH SVHC=Unknown, RoHS=Yes, RoHS Compliant=Yes, Series=RC, Size Code=0603, Stock 1=25249139, Supplier 1=Digi-Key, Termination=SMD/SMT, Tolerance=1%, Weight=7.1E-05oz, Width=0.8mm
R2: library part RC0603JR-070RL, "RES 0 OHM JUMPER 1/10W 0603", Case Code (Imperial)=0603, Case Code (Metric)=1608, LCSC Part Number=C95177, Manufacturer=Yageo, Max Operating Temperature=155°C, Max Power Dissipation=100mW, Min Operating Temperature=-55°C, Package Quantity=5000, Resistance=0mR, Resistance Tolerance=5%, Resistor Type="Thick Film", Supplier Part Number 1=311-0.0GRCT-ND, Temperature Coefficient=200ppm/°C, Tolerance=1%, Voltage Rating=50V, Case/Package=0603, Category="Chip SMD Resistors", Construction=Rectangular, Contact Plating=Tin,Matte, Depth=0.8mm, Features="Moisture Resistant", Height=0.45mm, Item Type=Resistor, Lead Free="Lead Free", Length=1.6mm, Manufacturer Part Number=RC0603JR-070RL, Military Standard=Not, Number of Pins=2, Number of Terminations=2, Packaging="Tape and Reel", Power Rating=100mW, Pricing 1="1=0.10000, 10=0.01700, 25=0.01240, 50=0.00960, 100=0.00700, 250=0.00536, 500=0.00430, 1000=0.00316 (USD)", Radiation Hardening=No, Reach SVHC Compliant="No SVHC", RoHS=Yes, RoHS Compliant=Yes, Series=RC, Size Code=0603, Stock 1=18081776, Supplier 1=Digi-Key, Technology="THICK FILM", Termination=SMD/SMT, Voltage Rating (DC)=50V, Width=0.8mm
R3: library part RC1206JR-070RL, "RES 0 OHM JUMPER 1/4W 1206", Case Code (Imperial)=1206, Case Code (Metric)=3216, Manufacturer=Yageo, Max Operating Temperature=155°C, Max Power Dissipation=250mW, Min Operating Temperature=-55°C, Package Quantity=1, Resistance Tolerance=5%, Resistor Type="Thick Film,Carbon Film", Supplier Part Number=1414689, Temperature Coefficient=200ppm/°C, Voltage Rating=200V, Case/Package=1206, ComponentLink1Description=https://datasheet.ciiva.com/11808/0900766b80c6630a-11808156.pdf?src-supplier=Rs, ComponentLink1URL=https://datasheet.ciiva.com/11808/0900766b80c6630a-11808156.pdf?src-supplier=Rs, ComponentLink2Description=https://datasheet.ciiva.com/29181/402222-da-01-en-smd-widerstand-0-ohm-1206-29181568.pdf?src-supplier=Conrad, ComponentLink2URL=https://datasheet.ciiva.com/29181/402222-da-01-en-smd-widerstand-0-ohm-1206-29181568.pdf?src-supplier=Conrad, ComponentLink3Description=https://datasheet.ciiva.com/7983/444357-7983807.pdf?src-supplier=Element14, ComponentLink3URL=https://datasheet.ciiva.com/7983/444357-7983807.pdf?src-supplier=Element14, ComponentLink4Description=https://datasheet.ciiva.com/22747/1692832-22747541.pdf?src-supplier=Element14, ComponentLink4URL=https://datasheet.ciiva.com/22747/1692832-22747541.pdf?src-supplier=Element14, ComponentLink5Description=https://datasheet.ciiva.com/46445/444357-46445719.pdf?src-supplier=Element14, ComponentLink5URL=https://datasheet.ciiva.com/46445/444357-46445719.pdf?src-supplier=Element14, ComponentLink6Description=https://datasheet.ciiva.com/2458/pyu-rc1206-51-rohs-l-4-2458669.pdf?src-supplier=Digikey, ComponentLink6URL=https://datasheet.ciiva.com/2458/pyu-rc1206-51-rohs-l-4-2458669.pdf?src-supplier=Digikey, ComponentLink7Description=https://datasheet.ciiva.com/2458/pyu-rc1206-51-rohs-l-4-2458670.pdf?src-supplier=Digikey, ComponentLink7URL=https://datasheet.ciiva.com/2458/pyu-rc1206-51-rohs-l-4-2458670.pdf?src-supplier=Digikey, ComponentLink8Description=https://datasheet.ciiva.com/2458/pyu-rc1206-51-rohs-l-4-2458668.pdf?src-supplier=Digikey, ComponentLink8URL=https://datasheet.ciiva.com/2458/pyu-rc1206-51-rohs-l-4-2458668.pdf?src-supplier=Digikey, ComponentLink9Description=https://datasheet.ciiva.com/7857/1692832-7857422.pdf?src-supplier=Element14, ComponentLink9URL=https://datasheet.ciiva.com/7857/1692832-7857422.pdf?src-supplier=Element14, ComponentLink10Description=https://datasheet.ciiva.com/7857/1692832-7857421.pdf?src-supplier=Element14, ComponentLink10URL=https://datasheet.ciiva.com/7857/1692832-7857421.pdf?src-supplier=Element14, ComponentLink11Description=https://datasheet.ciiva.com/17035/pyu-rc1206-51-rohs-l-4-17035512.pdf?src-supplier=Future+Electronics, ComponentLink11URL=https://datasheet.ciiva.com/17035/pyu-rc1206-51-rohs-l-4-17035512.pdf?src-supplier=Future+Electronics, Contact Plating=Tin,Matte, Depth=1.6mm, Features="Moisture Resistant", Height=0.026inch, Item Type=Resistors, Lead Free=5697LeadFree, Length=0.122inch, Manufacturer Part Number=RC1206JR-070RL, Number of Terminations=2, Packaging="Tape and Reel", Power Rating=250mW, Pricing="5000=0.0025, 15000=0.0039, 25000=0.0023, 50000=0.0037, 100000=0.0022, 200000=0.0035, 250000=0.0021, 625000=0.002 (USD)", Reach SVHC Compliant=Unknown, RoHS=Yes, RoHS Compliant=Yes, Series=RC, Stock=1115000, Supplier="Future Electronics", Technology="THICK FILM", Termination=SMD/SMT, Tolerance=5%, Width=0.063inch
R10: library part RC2010FK-0710KL, "SMD Chip Resistor, 10 kOhm, ± 1%, 750 mW, 2010 [5025 Metric], Thick Film, General Purpose", Manufacturer=Yageo, Supplier Part Number=603-RC2010FK-0710KL, Category="Chip SMD Resistors", ComponentLink1Description=https://datasheet.ciiva.com/12668/pyu-rc2010-51-rohs-l-4-12668253.pdf?src-supplier=Mouser, ComponentLink1URL=https://datasheet.ciiva.com/12668/pyu-rc2010-51-rohs-l-4-12668253.pdf?src-supplier=Mouser, ComponentLink2Description=https://datasheet.ciiva.com/7672/1563630-7672311.pdf?src-supplier=Element14, ComponentLink2URL=https://datasheet.ciiva.com/7672/1563630-7672311.pdf?src-supplier=Element14, ComponentLink3Description=https://datasheet.ciiva.com/7672/1563630-7672312.pdf?src-supplier=Element14, ComponentLink3URL=https://datasheet.ciiva.com/7672/1563630-7672312.pdf?src-supplier=Element14, Manufacturer Part Number=RC2010FK-0710KL, Pricing="1=0.12, 10=0.065, 50=0.065, 100=0.054, 1000=0.043, 10000=0.024 (USD)", RoHS=Yes, Stock=3614, Supplier=Mouser
R15: library part RC0603FR-071KL, "RES SMD 1K OHM 1% 1/10W 0603", Case Code (Imperial)=0603, Case Code (Metric)=1608, LCSC Part Number=C22548, Manufacturer=Yageo, Max Operating Temperature=155°C, Min Operating Temperature=-55°C, Power Rating=100mW, Resistance=1kR, Supplier Part Number 1=311-1.00KHRDKR-ND, Temperature Coefficient=100ppm/°C, Tolerance=1%, Voltage Rating=50V, Case/Package=0603, ComponentLink1Description=https://www.verical.com/server-webapp/html/getDatasheet?partID=409289&src-supplier=Verical, ComponentLink1URL=https://www.verical.com/server-webapp/html/getDatasheet?partID=409289&src-supplier=Verical, ComponentLink2Description=http://documents.rs-components.com/techlib://itc_doclist_GB.htm?stockno=5048928&src-supplier=RSComponents, ComponentLink2URL=http://documents.rs-components.com/techlib://itc_doclist_GB.htm?stockno=5048928&src-supplier=RSComponents, ComponentLink3Description=http://www.yageo.com/documents/recent/PYu-RC0603_51_RoHS_L_4.pdf?src-supplier=Avnet+Europe, ComponentLink3URL=http://www.yageo.com/documents/recent/PYu-RC0603_51_RoHS_L_4.pdf?src-supplier=Avnet+Europe, ComponentLink4Description=http://www.farnell.com/datasheets/2167052.pdf?src-supplier=Element14, ComponentLink4URL=http://www.farnell.com/datasheets/2167052.pdf?src-supplier=Element14, ComponentLink5Description=http://www.farnell.com/datasheets/1868787.pdf?src-supplier=Element14, ComponentLink5URL=http://www.farnell.com/datasheets/1868787.pdf?src-supplier=Element14, ComponentLink6Description=http://www.yageo.com/documents/recent/PYu-RC_Group_51_RoHS_L_2.pdf?src-supplier=Avnet, ComponentLink6URL=http://www.yageo.com/documents/recent/PYu-RC_Group_51_RoHS_L_2.pdf?src-supplier=Avnet, ComponentLink7Description=https://www.verical.com/server-webapp/html/getDatasheet?partID=404327&src-supplier=Verical, ComponentLink7URL=https://www.verical.com/server-webapp/html/getDatasheet?partID=404327&src-supplier=Verical, ComponentLink8Description=http://www.farnell.com/datasheets/443971.pdf?src-supplier=Element14, ComponentLink8URL=http://www.farnell.com/datasheets/443971.pdf?src-supplier=Element14, Composition="Thick Film", Contact Plating=Tin,Matte, Depth=0.8mm, Height=0.45mm, Item Type=Resistor, Lead Free="Lead Free", Length=1.6mm, Manufacturer Part Number=RC0603FR-071KL, Military Standard=Not, Packaging="Tape and Reel", Pricing 1="1=0.1, 10=0.023, 100=0.0094, 1000=0.0042, 2500=0.0037 (USD)", Radiation Hardening=No, REACH SVHC="No SVHC", Stock 1=21472395, Supplier 1=Digi-Key, Termination=SMD/SMT
SW3: "No NO 50mA 100MΩ 100000 Times 12V 130gf@±30gf Brick nogging SPST SMD Tactile Switches ROHS", LCSC Part Number=C963229, Manufacturer=G-Switch, Package=SMD, ComponentLink1Description=LCSC, ComponentLink1URL=https://www.lcsc.com/product-detail/Tactile-Switches_G-Switch-GT-TC074E-H080-L1_C963229.html, Item Type="Tactile Switch", Manufacturer Part Number=GT-TC074E-H080-L1
SW4: "50mA Lying SPST 24V Plugin Tactile Switches ROHS", Manufacturer="TE Connectivity", Category="Pushbutton Switches", ComponentLink1Description=https://datasheet.ciiva.com/30072/eng-cd-1825027-f-30072833.pdf?src-supplier=Onlinecomponents.com, ComponentLink1URL=https://datasheet.ciiva.com/30072/eng-cd-1825027-f-30072833.pdf?src-supplier=Onlinecomponents.com, ComponentLink2Description=https://datasheet.ciiva.com/16393/1825027-8-16393346.pdf?src-supplier=Future+Electronics, ComponentLink2URL=https://datasheet.ciiva.com/16393/1825027-8-16393346.pdf?src-supplier=Future+Electronics, ComponentLink3Description=https://datasheet.ciiva.com/8164/eng-cd-1825027-g4-8164921.pdf?src-supplier=Avnet, ComponentLink3URL=https://datasheet.ciiva.com/8164/eng-cd-1825027-g4-8164921.pdf?src-supplier=Avnet, Manufacturer Part Number=1825027-8, Pricing 1="1=0.13800, 10=0.13370, 25=0.12590, 100=0.10940, 250=0.10570, 500=0.09520, 1000=0.07320, 2500=0.07250, 5000=0.06250 (USD)", RoHS=Yes, Stock 1=178529, Supplier 1="Arrow Electronics", Supplier Part Number 1=1825027-8
U2: "RF TXRX MODULE BT PCB TRACE SMD", LCSC Part Number=C5361945, Manufacturer="Espressif Systems", Supplier Part Number=1965-ESP32-WROOM-32E-N8R2DKR-ND, Category=Uncategorized, Item Type=Module, Manufacturer Part Number=ESP32-WROOM-32E-N8R2, Pricing="1=2.88 (USD)", RoHS=No, Supplier=Digikey
U3: "SOT-223 Linear Voltage Regulators (LDO) ROHS", LCSC Part Number=C2992570, Manufacturer="GUOXIN JIAPIN SEMICONDUCTOR", Package=SOT-223, ComponentLink1Description=LCSC, ComponentLink1URL=https://www.lcsc.com/product-detail/Linear-Voltage-Regulators-LDO_GUOXIN-JIAPIN-SEMICONDUCTOR-AMS1117-3-3_C2992570.html, Item Type=IC, Manufacturer Part Number=AMS1117-3.3

## Free pads (board coordinates)
  round 2.6 / inner round 2.6 / far side round 0 hole 2 mask+0.05: MH(5,-0.544) MH(15,62.456) MH(75,62.456) MH(85,-0.544)

## Nets (pads, with @x,y where several pads share a name; then routed paths per layer and width w, separated by ;. In a path a pad name is that pad's centre, name@x,y a point inside that pad or via, vN(x,y) a via of type N, cw(c..) or ccw(c..) an arc to the next point about the centre after c; other vN are vias at no path point)
3.3V: C1.2 C4.2 C8.2 C9.2 C18.2 J3.1 Q1.1 R1.1 R9.1 R10.2 R13.1 U2.2 U3.2 U3.4 | length 142.1
  Top Layer w0.381: 12.09,6.625 12.09,-8.994 14.702,-11.606 R10.2 77.984,-11.606 87.452,-2.138 87.452,17.395 86.352,18.496 J3.1 ; 17.294,29.536 17.294,9.582 17.361,9.515
  Top Layer w0.508: U2.2 C18.2
5VCC: C6.2 C7.2 C10.2 C11.2 C12.2 C14.2 C15.2 C16.2 C17.2 FB1.1 LED4.1 LED5.1 LED6.1 LED7.1 LED8.1 LED9.1 R14.1 U3.3 | length 0.1
  Top Layer w0.508: 58.873,20.843 58.975,20.741
5VIN: C3.2 C5.2 D1.2 F1.1 J1.1
BUTTON: C23.2 R10.1 SW4.2 U2.8 | length 93
  Top Layer w0.381: SW4.2 44.375,-2.53 63.215,-2.53 63.949,-1.796 63.949,31.294 64.865,32.21 77.073,32.21 78.254,33.391 78.254,45.032 77.648,45.637 74.052,45.637 73.478,46.211 U2.8
D-GND: C1.1 C2.1 C18.1 pad.MH@5,-0.544 pad.MH@15,62.456 pad.MH@75,62.456 R3.1 U2.1
DIN: Q1.2 R13.2 U2.10 | length 5
  Top Layer w0.508: U2.10 71.134,47.861 71.134,48.714 71.432,49.012 73.577,49.012 73.874,49.309 73.874,50.138 R13.2
DIN#: LED4.4 R2.2 R15.2 | length 43.7
  Top Layer w0.508: LED4.4 41.691,36.113 41.691,49.513 44.695,52.517 69.084,52.517 R2.2
DOUT1: LED4.2 LED5.4 | length 7.8
  Top Layer w0.508: LED5.4@33.367,26.956 33.367,28.447 cw(c34.683,28.447) 33.753,29.377 cw(c34.469,28.661) 34.469,29.674 36.878,29.674 ccw(c36.878,32.214) 38.674,30.418 LED4.2
DOUT2: LED5.2 LED6.4 | length 6.5
  Top Layer w0.508: LED5.2@36.667,21.956 36.667,16.519 ccw(c37.976,16.519) LED6.4
DOUT3: LED6.2 LED7.4 | length 6.9
  Top Layer w0.508: LED6.2 cw(c43.031,15.197) 43.564,15.731 45.71,13.585 ccw(c47.506,15.381) 47.506,12.841 47.98,12.841 ccw(c47.98,13.848) LED7.4
DOUT4: LED7.2 LED8.4 | length 7.5
  Top Layer w0.508: LED7.2 51.429,18.55 cw(c53.225,16.754) 53.225,19.294 54.8,19.294 ccw(c54.8,21.462) 56.333,19.929 ccw(c55.569,20.693) 56.65,20.693 LED8.4
DOUT5: LED8.2 LED9.4 | length 6.6
  Top Layer w0.508: LED9.4 cw(c52.896,33.197) 53.35,33.197 LED8.2
EN: C2.2 J3.6 R1.2 U2.3 | length 75.6
  Top Layer w0.305: R1.2 U2.3 79.828,45.566 ; J3.6 66.856,13.496 64.924,15.427 64.924,31.061 65.352,31.489 78.511,31.489 79.828,32.806 79.828,45.566 ; C2.2 83.74,49.443 83.207,48.91 83.207,45.566 82.727,45.086 80.308,45.086 79.828,45.566
GND: C3.1 C4.1 C5.1 C6.1 C7.1 C8.1 C9.1 C10.1 C11.1 C12.1 C14.1 C15.1 C16.1 C17.1 C22.1 C23.1 D1.1 J1.2 J3.2 J3.MP1 J3.MP2 LED4.3 LED5.3 LED6.3 LED7.3 LED8.3 LED9.3 pad.MH@85,-0.544 R3.2 SW3.1 SW3.2 SW4.1 SW4.3 SW4.4 U2.38 U2.39 U2.40 U2.41 U2.42 U2.43 U2.44 U2.45 U2.46 U2.47 U3.1 | length 2.7
  Top Layer w0.508: C22.1 40.025,23.301 cw(c39.98,23.301) 40.012,23.269 40.037,23.269 40.35,22.956 SW3.2
IO0: J3.5 U2.25 | length 31.9
  Top Layer w0.381: U2.25 65.858,28.946 65.858,16.627 67.989,14.496 J3.5
IOT_BUT: C22.2 R9.2 SW3.3 SW3.4 U2.11 | length 58.8
  Top Layer w0.508: SW3.4 41.543,25.956 41.397,26.102 41.397,33.706 43.005,35.313 43.005,47.735 45.164,49.894 R9.2 69.096,49.831 69.477,49.45 69.477,47.856 U2.11
  Top Layer w0.635: SW3.4 SW3.3
NetF1_2: F1.2 FB1.2
NetQ1_3: Q1.3 R2.1 R14.2 R15.1
RXD: J3.4 U2.34 | length 19.9
  Top Layer w0.381: U2.34 77.288,16.812 78.605,15.496 J3.4
TXD: J3.3 U2.35 | length 17.8
  Top Layer w0.381: U2.35 78.558,17.566 79.629,16.496 80.629,16.496 80.997,16.496 J3.3
pads on no net: J1.3 LED9.2 U2.4 U2.5 U2.6 U2.7 U2.9 U2.12 U2.13 U2.14 U2.15 U2.16 U2.17 U2.18 U2.19 U2.20 U2.21 U2.22 U2.23 U2.24 U2.26 U2.27 U2.28 U2.29 U2.30 U2.31 U2.32 U2.33 U2.36 U2.37

## Polygon pours and split planes (outlines as drawn)
D-GND on Top Layer "NONET_L-01_P-001" (solid, pour order 2): 84.057,48.443 84.057,58.144 84.016,58.186 83.771,58.496 83.355,58.984 82.889,59.518 82.412,60.065 82.081,60.41 81.47,61.046 80.922,61.59 80.012,62.446 79.631,62.77 79.19,63.145 78.553,63.667 77.985,64.103 77.495,64.478 76.829,64.937 76.163,65.396 75.874,65.574 75.17,66.009 74.577,66.361 73.369,67.024 72.641,67.377 71.914,67.731 70.976,68.128 70.425,68.362 70.082,68.488 69.394,68.739 68.906,68.918 68.133,69.157 67.823,69.253 67.36,69.397 66.999,69.489 66.577,69.596 65.793,69.796 65,69.956 25,69.956 22.443,69.336 19.575,68.362 17.732,67.559 15.213,66.245 13.837,65.396 11.863,63.986 10.604,62.97 9.399,61.892 8.367,60.876 7.179,59.596 5.896,58.075 5.146,57.127 3.618,54.933 2.776,53.593 1.697,51.666 1.155,50.622 0.648,49.52 0.179,48.443 0,48 0,0 0.784,-1.326 1.832,-2.918 2.792,-4.226 3.966,-5.676 5.216,-7.046 6.456,-8.277 7.203,-8.974 8.09,-9.731 8.983,-10.449 10.037,-11.24 15.058,-11.24 15.058,56.708 81.574,56.708 81.81,56.473 81.81,46.915 82.868,46.915 82.87,48.443
GND on Top Layer "NONET_L02_P-001" (solid, remove dead copper, pour order 1): 0.63,48.115 0.63,0.115 1.322,-1.031 2.104,-2.262 3.289,-3.881 4.779,-5.663 7.263,-8.176 8.895,-9.595 10.282,-10.608 11.493,-11.446 12.827,-12.332 77.219,-12.132 80.602,-9.825 84.902,-5.916 88.26,-1.718 89.276,0.115 89.276,21.173 83.435,21.173 83.435,48.478 89.089,48.478 88.006,50.86 86.42,53.768 84.511,56.715 81.642,60.066 79.638,61.953 75.466,65.155 72.766,66.608 69.464,68.132 64.983,69.402 25.086,69.402 23.412,69.037 19.335,67.608 15.013,65.276 12.282,63.381 10.072,61.54 8.428,59.851 5.55,56.218 3.868,53.881

## Other copper
Top Layer:
  rectangle net 5VCC: 29.106,0.644 32.106,7.667
  rectangle net 5VCC: 23.057,0.587 30.169,1.66
  rectangle net 3.3V: 11.9,5.742 18.841,11.171
  rectangle net NetF1_2: 18.967,0.078 22.257,1.778
  rectangle net 3.3V: 19.935,11.532 26.006,13.756
  rectangle net 5VCC: 23.561,14.146 31.746,16.723
  region net 5VCC: 29.106,54.498 29.106,53.304 69.541,53.304 69.541,54.498
  rectangle net 3.3V: 80.648,46.915 81.581,52.161
  rectangle net 3.3V: 79.384,50.802 81.581,56.403
  rectangle net 3.3V: 71.484,52.276 79.828,52.822
  region net NetQ1_3: 70.227,54.358 70.227,53.022 73.384,53.022 73.384,54.358
  rectangle net 3.3V: 71.484,49.615 72.786,52.822
  rectangle net 3.3V: 70.239,49.615 72.786,50.339
  rectangle net DIN: 73.439,49.741 74.43,52.053
  rectangle net NetQ1_3: 70.227,50.777 70.989,53.965
  rectangle net 3.3V: 15.338,55.082 81.581,56.403
  rectangle net 3.3V: 11.9,10.663 20.735,56.403
  region net 5VCC: 59.813,39.494 48.246,39.494 48.246,37.487 59.813,37.487
  rectangle net 5VCC: 29.155,37.963 34.184,53.914
  rectangle net BUTTON: 34.105,-8.041 40.663,-6.242
  rectangle net GND: 72.544,38.061 76.752,42.269
  rectangle net 5VIN: 15.866,-3.585 20.738,-0.903
  region net 5VCC: 58.161,11.636 54.894,17.294 52.123,15.694 55.39,10.036
  region net 5VCC: 35.108,31.619 38.01,33.295 34.184,39.922 31.282,38.246
  region net 5VCC: 46.651,36.731 49.303,35.2 50.898,37.963 48.246,39.494
  rectangle net IOT_BUT: 39.708,25.556 42.25,26.356
  rectangle net IOT_BUT: 39.708,24.952 40.343,26.356
  rectangle net 5VCC: 29.206,19.637 33.901,22.706
  region net 5VCC: 59.813,11.75 29.106,11.75 29.106,6.517 59.813,6.517
  rectangle net 5VCC: 29.106,9.769 31.746,53.522
  rectangle net 5VCC: 57.759,9.826 59.813,39.494
  region net 5VCC: 59.813,29.466 56.15,29.466 56.15,26.206 59.813,26.206
  region net 5VCC: 42.354,9.989 43.705,12.329 40.981,13.902 39.63,11.562
  pour cut-out: 12.548,5.742 12.548,2.155 12.548,-13.044 11.532,-13.044 11.532,3.069 11.532,5.742
  pour cut-out: 41.251,48.783 41.251,53.123 44.599,53.123 44.599,48.783

## Silkscreen, mask and mechanical layers (free items; w line width, h text height)
Top Overlay:
  lines w0.127: 82.356,49.659 82.754,49.659 83.161,49.253 84.545,49.253 84.545,49.57
  text "IoT-Button-v2.1" at 24.976,63.842 h4
  text "IoT" at 41.388,26.94 h3.81
  text "SERIAL" at 80.69,11.045 h1.52 r90
  text "PROGRAMING" at 82.049,11.04 h1.52 r90
  text "POWER" at 27.24,-12.971 h3.81 r90
  text "INPUT" at 52.691,-13.04 h3.81 r90
Bottom Overlay:
  drawing of 3075 lines, arcs and shapes, not listed
  text "ZERO CARBON FOOTPRINT" at 31.427,46.122 h0.97
Deimensions:
  circle w0.006: c198.847,12.104 r0.003
  circle w0.006: c198.847,12.25 r0.003
  circle w0.006: c199.05,12.212 r0.003
  circle w0.006: c199.025,12.675 r0.003
  circle w0.006: c199.025,12.637 r0.003
  circle w0.006: c199.05,12.637 r0.003
  circle w0.006: c198.607,10.886 r0.003
  circle w0.006: c198.485,10.886 r0.003
  circle w0.006: c198.485,10.856 r0.003
  circle w0.006: c201.712,11.868 r0.003
  circle w0.006: c201.712,11.653 r0.003
  circle w0.006: c199.68,11.653 r0.003
  circle w0.006: c201.938,13.253 r0.003
  circle w0.006: c201.458,13.253 r0.003
  circle w0.006: c201.712,11.653 r0.003
  circle w0.006: c202.068,13.443 r0.003
  circle w0.006: c201.022,13.443 r0.003
  circle w0.006: c201.022,11.335 r0.003
  circle w0.006: c201.839,11.121 r0.003
  circle w0.006: c201.839,12.276 r0.003
  circle w0.006: c199.553,12.276 r0.003
  circle w0.254: c45,24.456 r10
  lines w0.254: 42,21.456 42,27.456 48,27.456 48,21.456 42,21.456 ; 43.5,24.456 cw(c45,24.456) 46.5,24.456 cw(c45,24.456) 43.5,24.456
Board Outline:
  lines w0.254: 40.5,-13.044 43.5,-13.044 ; 83.74,29.849 83.74,47.989 90,48 ccw(c52.9,33.047) 81.75,60.754 ccw(c58.67,38.589) 65,69.956 25,69.956 ccw(c31.33,38.589) 8.25,60.754 ccw(c37.1,33.047) 0,48 0,0 ccw(c30.512,17.147) 12.805,-13.044 77.195,-13.044 ccw(c59.488,17.147) 90,0 90,29.867 83.74,29.855 ; 4,-0.544 cw(c5,-0.544) 6,-0.544 cw(c5,-0.544) 4,-0.544 ; 14,62.456 ccw(c15,62.456) 16,62.456 ccw(c15,62.456) 14,62.456 ; 74,62.456 ccw(c75,62.456) 76,62.456 ccw(c75,62.456) 74,62.456 ; 84,-0.544 cw(c85,-0.544) 86,-0.544 cw(c85,-0.544) 84,-0.544
Fabrication:
  drawing of 224 lines, arcs and shapes, not listed
  text "Layer" at 107.298,22.697 h1.52
  text "Name" at 117.71,22.697 h1.52
  text "Material" at 141.326,22.697 h1.52
  text "Thickness" at 163.164,22.697 h1.52
  text "Constant" at 179.67,22.697 h1.52
  text "Board Layer Stack" at 194.144,22.697 h1.52
  text "Top Overlay" at 117.71,19.649 h1.52
  text "Top Solder" at 117.71,16.601 h1.52
  text "Solder Resist" at 141.326,16.601 h1.52
  text "0.010mm" at 163.164,16.601 h1.52
  text "3.5" at 179.67,16.601 h1.52
  text "1" at 107.298,13.553 h1.52
  text "Top Layer" at 117.71,13.553 h1.52
  text "0.035mm" at 163.164,13.553 h1.52
  text "Dielectric 1" at 117.71,10.505 h1.52
  text "FR-4" at 141.326,10.505 h1.52
  text "1.100mm" at 163.164,10.505 h1.52
  text "4.8" at 179.67,10.505 h1.52
  text "2" at 107.298,7.457 h1.52
  text "Bottom Layer" at 117.71,7.457 h1.52
  text "0.035mm" at 163.164,7.457 h1.52
  text "Bottom Solder" at 117.71,4.409 h1.52
  text "Solder Resist" at 141.326,4.409 h1.52
  text "0.010mm" at 163.164,4.409 h1.52
  text "3.5" at 179.67,4.409 h1.52
  text "Bottom Overlay" at 117.71,1.361 h1.52
  text "Total board thickness:" at 107.298,-1.687 h1.52
  text "1.190mm" at 163.164,-1.687 h1.52
  text "Note:" at 105.692,-11.415 h5.08
  text "1.Top layer is only signal layer in PCB" at 105.819,-14.974 h5.08
  text "2. PCB thickness would be 1.2mm" at 105.692,-20.661 h5.08
Drill Drawing:
  circle w0.254: c108.308,46.023 r0.847
  lines w0.254: 107.461,37.98 107.885,37.98 108.308,37.556 108.731,37.98 109.155,37.98 108.731,38.403 109.155,38.826 108.731,38.826 108.308,39.25 107.885,38.826 107.461,38.826 107.885,38.403 107.461,37.98 ; 107.461,41.366 108.308,41.79 109.155,41.366 108.731,42.213 109.155,43.06 108.308,42.636 107.461,43.06 107.885,42.213 107.461,41.366 ; 107.461,50.68 109.155,50.68 108.308,48.986 107.461,50.68
  lines w0.381: 105.943,36.413 445.496,36.413 ; 105.943,51.653 445.496,51.653 ; 119.935,32.603 119.935,55.463 ; 133.14,32.603 133.14,55.463 ; 161.071,32.603 161.071,55.463 ; 173.921,32.603 173.921,55.463 ; 192.559,32.603 192.559,55.463 ; 230.648,32.603 230.648,55.463 ; 245.63,32.603 245.63,55.463 ; 264.573,32.603 264.573,55.463 ; 292.759,32.603 292.759,55.463 ; 314.445,32.603 314.445,55.463 ; 348.318,32.603 348.318,55.463 ; 382.192,32.603 382.192,55.463 ; 409.87,32.603 409.87,55.463 ; 105.943,32.603 445.496,32.603 445.496,55.463 105.943,55.463 105.943,32.603
  text "Symbol" at 108.229,52.796 h1.83
  text "Count" at 121.078,52.796 h1.83
  text "Hole Size" at 134.283,52.796 h1.83
  text "Plated" at 162.214,52.796 h1.83
  text "Hole Type" at 175.064,52.796 h1.83
  text "Drill Layer Pair" at 193.702,52.796 h1.83
  text "Via/Pad" at 231.791,52.796 h1.83
  text "Pad Shape" at 246.773,52.796 h1.83
  text "Template" at 265.716,52.796 h1.83
  text "Description" at 293.902,52.796 h1.83
  text "Hole Tolerance (+)" at 315.588,52.796 h1.83
  text "Hole Tolerance (-)" at 349.461,52.796 h1.83
  text "Hole Length" at 383.335,52.796 h1.83
  text "Routed Path Length" at 411.013,52.796 h1.83
  text "2" at 121.078,48.986 h1.52
  text "1.100mm (43.31mil)" at 134.283,48.986 h1.52
  text "PTH" at 162.214,48.986 h1.52
  text "Round" at 175.064,48.986 h1.52
  text "Top Layer - Bottom Layer" at 193.702,48.986 h1.52
  text "Pad" at 231.791,48.986 h1.52
  text "Rounded" at 246.773,48.986 h1.52
  text "c180h110" at 265.716,48.986 h1.52
  text "-" at 383.335,48.986 h1.52
  text "-" at 411.013,48.986 h1.52
  text "2" at 121.078,45.176 h1.52
  text "1.300mm (51.18mil)" at 134.283,45.176 h1.52
  text "PTH" at 162.214,45.176 h1.52
  text "Round" at 175.064,45.176 h1.52
  text "Top Layer - Bottom Layer" at 193.702,45.176 h1.52
  text "Pad" at 231.791,45.176 h1.52
  text "Rounded" at 246.773,45.176 h1.52
  text "c210h130" at 265.716,45.176 h1.52
  text "-" at 383.335,45.176 h1.52
  text "-" at 411.013,45.176 h1.52
  text "3" at 121.078,41.366 h1.52
  text "0.800mm (31.50mil)" at 134.283,41.366 h1.52
  text "PTH" at 162.214,41.366 h1.52
  text "Slot" at 175.064,41.366 h1.52
  text "Top Layer - Bottom Layer" at 193.702,41.366 h1.52
  text "Pad" at 231.791,41.366 h1.52
  text "Rectangle" at 246.773,41.366 h1.52
  text "r140_210h80_150" at 265.716,41.366 h1.52
  text "1.500mm (59.06mil)" at 383.335,41.366 h1.52
  text "0.700mm (27.56mil)" at 411.013,41.366 h1.52
  text "4" at 121.078,37.556 h1.52
  text "2.000mm (78.74mil)" at 134.283,37.556 h1.52
  text "PTH" at 162.214,37.556 h1.52
  text "Round" at 175.064,37.556 h1.52
  text "Top Layer - Bottom Layer" at 193.702,37.556 h1.52
  text "Pad" at 231.791,37.556 h1.52
  text "Rounded" at 246.773,37.556 h1.52
  text "c260h200x0m265mx5" at 265.716,37.556 h1.52
  text "-" at 383.335,37.556 h1.52
  text "-" at 411.013,37.556 h1.52
  text "11 Total" at 121.078,33.746 h1.52
  text "Slot definitions :" at 108.229,30.064 h1.52
  text "Routed Path Length" at 134.459,30.064 h1.52
  text "= Calculated from tool start centre position to tool end centre position." at 162.467,30.064 h1.52
  text "Hole Length" at 134.459,27.525 h1.52
  text "= Routed Path Length + Tool Size = Slot length as defined in the PCB layout" at 152.056,27.525 h1.52

## Dimensions
65.147,70.17 to 77.195,-13.044 on Deimensions
90,0 to 90,48 on Deimensions
90,0 to 0,0 on Deimensions
12.29,-13.091 to 77.195,-13.044 on Deimensions

## Text inside footprints (layer, text, board x,y; h text height)
SW4: Bottom Overlay "PCB Edge" at 44.147,-9.29 h1